# Altium PCB PCB2.PcbDoc
Units mil, origin at the board's own origin, x right, y up, seen from the top; angles counter-clockwise.
Board outline 954.83 x 957.14 mil, 2 copper layers (Top Layer, Bottom Layer); 36 components, 33 nets, 168 pads, 2 vias.
Unrouted connection lines stored in the file: 90.
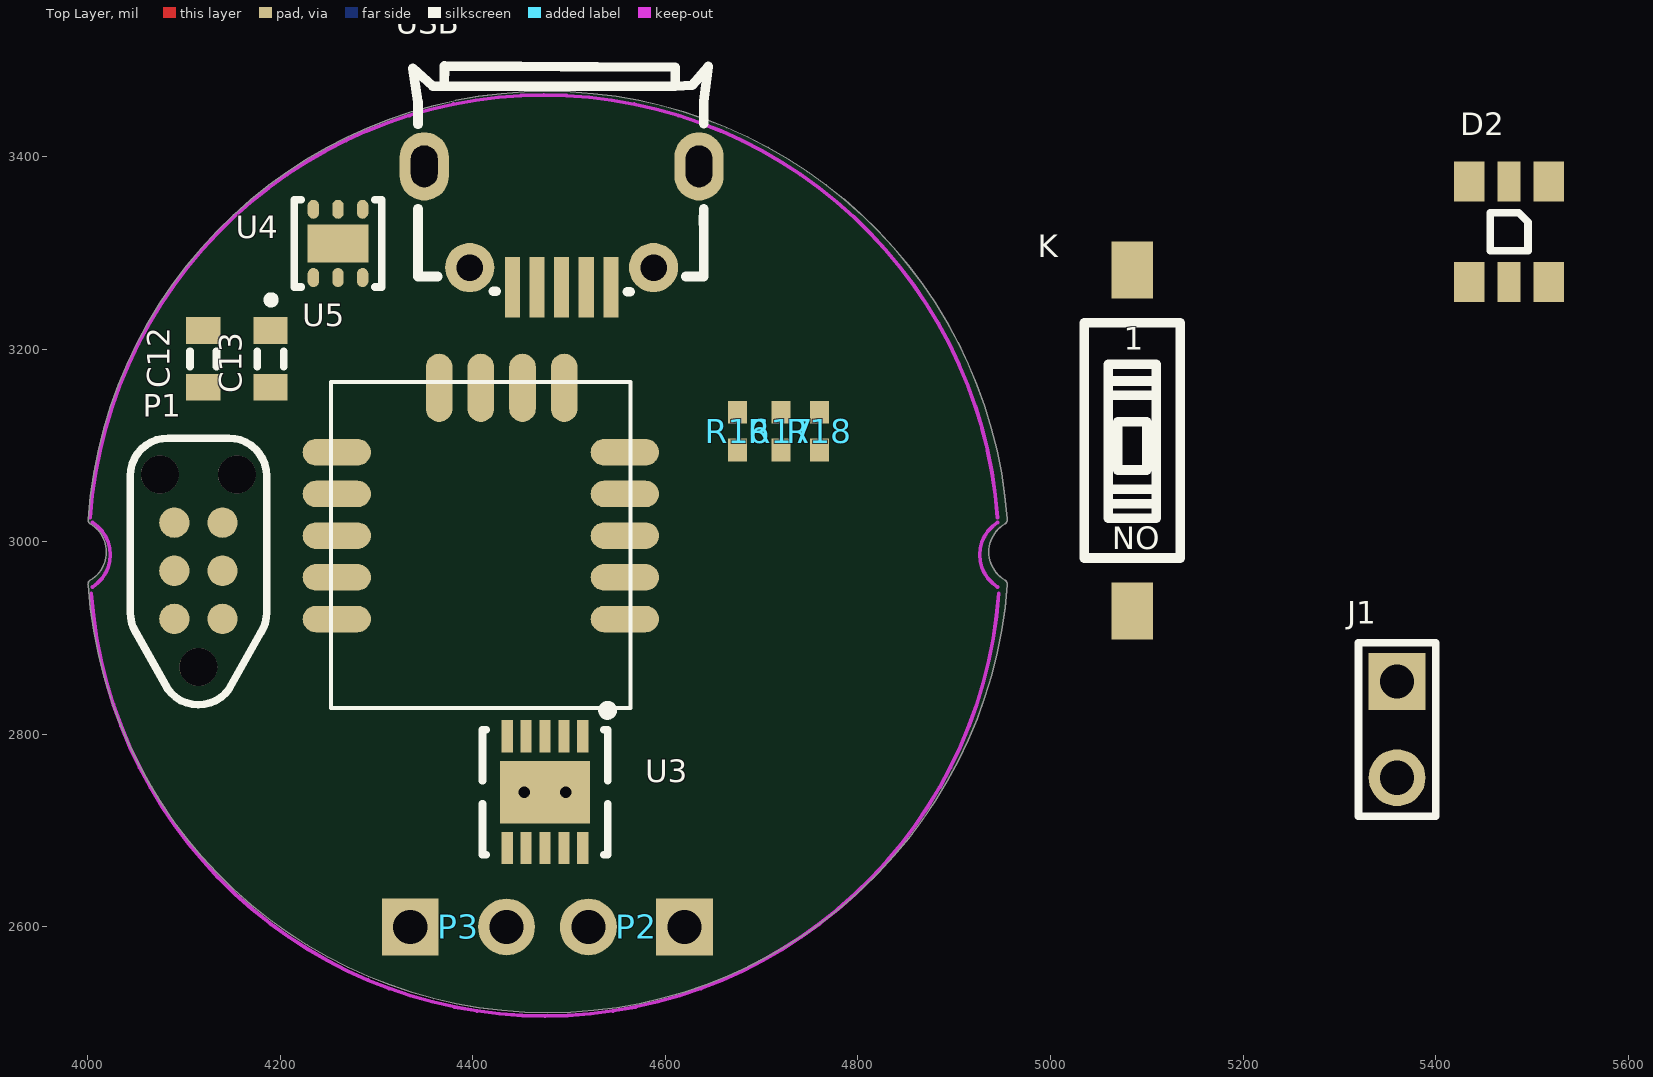
[diagram p0: Top Layer view]
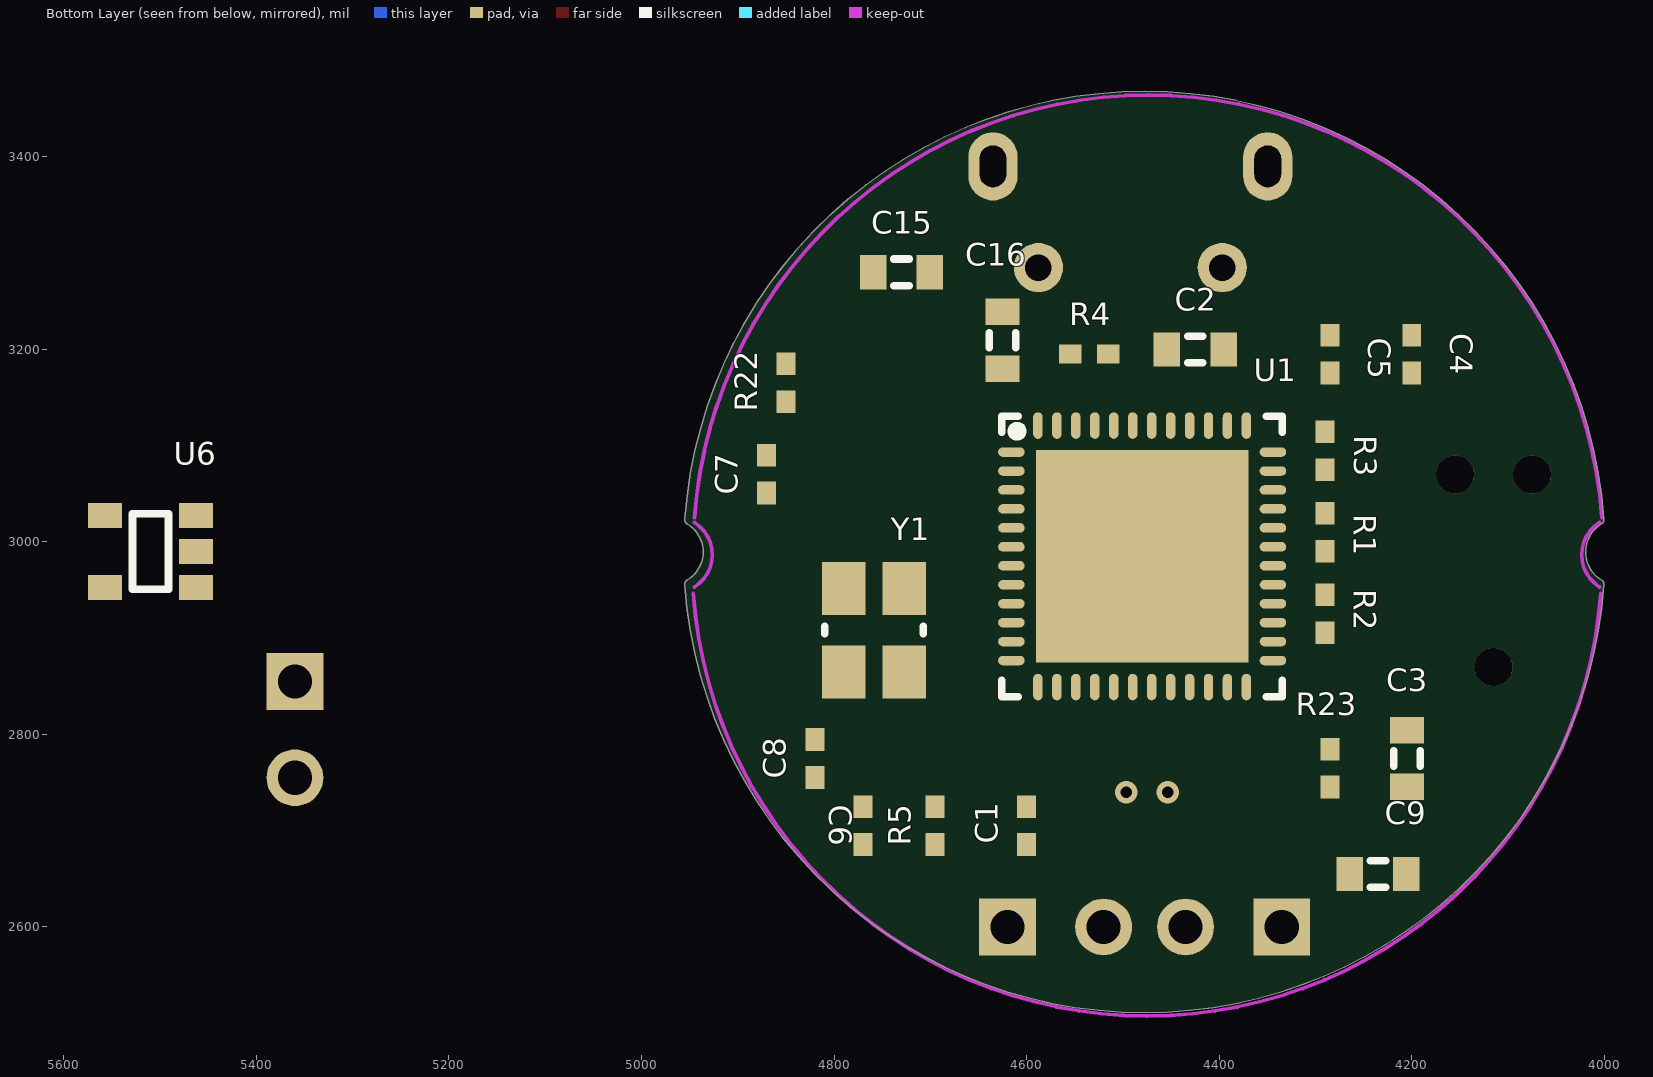
[diagram p1: Bottom Layer view, seen from below]

## Layer stack, top to bottom
Top Solder: solder mask 0.4, Solder Resist, Dk 3.5
Top Layer: signal copper 1.4
Dielectric 1: dielectric 12.6, FR-4, Dk 4.8
Bottom Layer: signal copper 1.4
Bottom Solder: solder mask 0.4, Solder Resist, Dk 3.5

## Board outline
4000.38,2955.11 cw(c4005.32,2955.99) 4002.77,2960.31 ccw(c3985.59,2989.47) 4019.43,2989.47 ccw(c3985.59,2989.47) 4002.8,3018.61 cw(c4005.35,3022.93) 4000.34,3023.28 cw(c4477.72,2989.47) 4955.05,3023.82 4955.13,3022.94 cw(c4950.12,3022.94) 4952.66,3018.62 ccw(c4969.84,2989.47) 4952.64,2960.33 cw(c4950.09,2956.01) 4955.11,2956.01 4955.09,2955.65 cw(c4477.72,2989.47)

## Design rules (kind name [scope] priority, off if disabled: settings)
Clearance [All] p1: gap=5 ignorepadtopadclearanceinfootprint=FALSE
PolygonConnect [All] p1: connectstyle=Relief reliefconductorwidth=10 reliefentries=4 polygonreliefangle="90 Angle" airgapwidth=10
RoutingVias [All] p1: holewidth=28 width=50 viastyle="Through Hole" minholewidth=28 minwidth=50 maxholewidth=28 maxwidth=50
SolderMaskExpansion [All] p1: expansion=4 istentingtop=FALSE
Width [All] p1: maxlimit=10 minlimit=10 preferedwidth=10
30 further rules are at their usual default settings.

## Classes and differential pairs
net class RGBLED[1..3]: RGBLED1 RGBLED2 RGBLED3
net class MOTOR_CONTROL[1..4]: MOTOR_CONTROL1 MOTOR_CONTROL2 MOTOR_CONTROL3 MOTOR_CONTROL4

## Components (designator, comment, footprint, x,y, rotation, side; value= is the part's Value field where it differs from the comment)
C1 "10nF" 0402 4600,2705.31 r90 bottom
C2 "1uF" 0603 4425,3200 r180 bottom
C3 "4.7uF" 0603 4205,2775 r270 bottom
C4 "100nF" 0402 4200,3195 r270 bottom
C5 "100nF" 0402 4285,3195 r270 bottom
C6 "100nF" 0402 4770,2705.32 r270 bottom
C7 "22pF" 0402 4870,3070.31 r90 bottom
C8 "22pF" 0402 4820,2775 r90 bottom
C9 "10uF" 0603 4235,2655 r180 bottom
C12 "1uF" 0603 4120,3190 r90 top
C13 "1uF" 0603 4190,3190 r270 top
C15 "4.7uF" 0603 4730,3280 r0 bottom
C16 "4.7uF" 0603 4625,3209.53 r270 bottom
D2 "SMLVN6RGB1W1" "3.5x2.8 mm 6-SMD" 5476.34,3322.16 r270 top
J1 "78171-0002" HDR1*2 5360,2805 r0 top
K "2.54-1P-PGT" SW-SMD_2P-L6.2-LS9.4 5085,3100 r270 top
P1 "TC2030-IDC-NL" TC2030-IDC-NL 4115,2970 r90 top
P2 "HEADER 2X1 0.05\" UNPOLARIZED" HDR1*2 4570,2600 r270 top
P3 "HEADER 2X1 0.05\" UNPOLARIZED" HDR1*2 4385,2600 r90 top
R1 "22R" 0402 4290,3010 r270 bottom
R2 "22R" 0402 4290,2925.32 r270 bottom
R3 "22R" 0402 4290,3094.68 r90 bottom
R4 "100K" 0402 4535,3195 r180 bottom
R5 "100K" 0402 4695,2705.31 r90 bottom
R16 "22.6R" 0402 4675,3115 r90 top
R17 "130R" 0402 4720,3115 r90 top
R18 "24.9R" 0402 4760,3115 r90 top
R22 "10K" 0402 4850,3165.31 r90 bottom
R23 "100K" 0402 4285,2765 r270 bottom
U1 "STM32F051C8U6" QFN50P700X700X60_HS-49L 4480,2985 r180 bottom
U3 "A3901SEJTR-T" DFN50P300X300X75_HS-11N 4475,2740 r180 top
U4 "ADP122ACPZ-3.3-R7" "LFCSP-6 2.0X2.0X0.55" 4260,3310 r0 top
U5 "DX-BT24-T" DX-BT24-T 4408.31,2996.61 r180 top
U6 "MCP73831T-2ACI/OT" SOT-23-OT5_L 5510,2990 r0 bottom
USB "MicroXNJ" MICRO-USB-SMD_MICROXNJ 4492.29,3327.15 r180 top
Y1 "7V-16.000MAAE-T" "3.2x2.5 CRYSTAL" 4758.5,2908.31 r270 bottom

## Footprints (in the part's own frame and the unit in brackets; to place one, negate y for a bottom-side part, rotate by r counter-clockwise, add the part's x,y. Pads: shape width x height; smd on the part's side, far side on the other; paste and mask are expansions set on the pad)
"3.2x2.5 CRYSTAL" [mm]
  rect 1.4x1.15 smd: 1(-1.1,-0.8) 2(1.1,-0.8) 3(1.1,0.8) 4(-1.1,0.8)
  silkscreen extent -0.1,-1.3 0.1,1.3, body extent -1.6,-1.25 1.6,1.25, height 0.8
"3.5x2.8 mm 6-SMD" [mm] "3.5 x 2.8 mm 6-SMD Flat Leads"
  rect 1.05x0.8 smd: 1(-1.325,1.05) 3(-1.325,-1.05) 4(1.325,-1.05) 6(1.325,1.05)
  rect 1.05x0.6 smd: 2(-1.325,0) 5(1.325,0)
  silkscreen extent -0.5,-0.5 0.5,0.5, body extent -1.75,-1.4 1.75,1.4, height 0.6
0402 [mm] "Chip Body 1.0 x 0.5 mm (LxW typ)"
  rect 0.6x0.5 smd: 1(-0.5,0) 2(0.5,0)
  body extent -0.55,-0.3 0.55,0.3, height 0.55
0603 [mm] "Chip Body 1.6 x 0.8 mm (LxW typ)"
  rect 0.7x0.9 smd: 1(-0.75,0) 2(0.75,0)
  silkscreen extent -0.2,-0.35 0.2,0.35, body extent -0.85,-0.48 0.85,0.48, height 0.9
DFN50P300X300X75_HS-11N [mm]
  rect 0.3x0.85 smd: 1(-1,-1.475) 2(-0.5,-1.475) 3(0,-1.475) 4(0.5,-1.475) 5(1,-1.475) 6(1,1.475) 7(0.5,1.475) 8(0,1.475) 9(-0.5,1.475) 10(-1,1.475)
  rect 2.38x1.65 smd: 11(0,0)
  silkscreen extent -1.78,-2.28 1.65,1.65, body extent -1.5,-1.5 1.5,1.5, height 0.75
DX-BT24-T [mm] "DX-BT24-T"
  oval 1.8x0.7 smd: 1(-3.8,1.95) 2(-3.8,0.85) 2(3.8,-2.45) 3(-3.8,-0.25) 3(3.8,0.85) 4(-3.8,-1.35) 5(-3.8,-2.45) 11(3.8,-1.35) 12(3.8,-0.25) 14(3.8,1.95)
  oval 0.7x1.8 smd: 6(-2.2,-4.15) 7(-1.1,-4.15) 8(0,-4.15) 9(1.1,-4.15)
  silkscreen extent -3.95,-4.3 3.95,4.3
HDR1*2 [mm]
  rect 1.5x1.5 hole 0.9: 1(0,1.27)
  round 1.5 hole 0.9: 2(0,-1.27)
  silkscreen extent -1.02,-2.29 1.02,2.29
"LFCSP-6 2.0X2.0X0.55" [mm] ". 6-Lead Lead Frame Chip Scale Package [LFCSP_UD]  2.00 mm?2.00 mm Body, Ultra Thin, Dual Lead  (CP-6-3)"
  oval 0.3x0.5 smd: 1(-0.65,-0.9) 2(0,-0.9) 3(0.65,-0.9) 4(0.65,0.9) 5(0,0.9) 6(-0.65,0.9)
  rect 1.6x1 smd: 7(0,0)
  silkscreen extent -1.86,-1.59 1.15,1.15, body extent -1,-1 1,1, height 0.6
MICRO-USB-SMD_MICROXNJ [mm]
  rect 0.4x1.6 smd paste-100 mask+0.051: 1(-1.3,1.596) 2(-0.65,1.596) 3(0,1.596) 4(0.65,1.596) 5(1.3,1.596)
  round 1.3 hole 0.7: 6(2.425,1.074) 9(-2.425,1.074)
  oval 1.3x1.8 hole 0.7 slot 1.1 at 90 deg: 7(3.625,-1.596) 8(-3.625,-1.596)
  silkscreen extent -3.87,-4.24 3.93,1.71
QFN50P700X700X60_HS-49L [mm] "QFN, 48-Leads, Body 7,00x7,00mm, Pitch 0,50mm, Thermal Pad 5,60x5,60mm, IPC High Density"
  oval 0.7x0.25 smd: 1(-3.45,2.75) 2(-3.45,2.25) 3(-3.45,1.75) 4(-3.45,1.25) 5(-3.45,0.75) 6(-3.45,0.25) 7(-3.45,-0.25) 8(-3.45,-0.75) 9(-3.45,-1.25) 10(-3.45,-1.75) 11(-3.45,-2.25) 12(-3.45,-2.75) 25(3.45,-2.75) 26(3.45,-2.25) 27(3.45,-1.75) 28(3.45,-1.25) 29(3.45,-0.75) 30(3.45,-0.25) 31(3.45,0.25) 32(3.45,0.75) 33(3.45,1.25) 34(3.45,1.75) 35(3.45,2.25) 36(3.45,2.75)
  oval 0.25x0.7 smd: 13(-2.75,-3.45) 14(-2.25,-3.45) 15(-1.75,-3.45) 16(-1.25,-3.45) 17(-0.75,-3.45) 18(-0.25,-3.45) 19(0.25,-3.45) 20(0.75,-3.45) 21(1.25,-3.45) 22(1.75,-3.45) 23(2.25,-3.45) 24(2.75,-3.45) 37(2.75,3.45) 38(2.25,3.45) 39(1.75,3.45) 40(1.25,3.45) 41(0.75,3.45) 42(0.25,3.45) 43(-0.25,3.45) 44(-0.75,3.45) 45(-1.25,3.45) 46(-1.75,3.45) 47(-2.25,3.45) 48(-2.75,3.45)
  rect 5.6x5.6 smd: 49(0,0)
  silkscreen extent -3.7,-3.7 3.7,3.7, body extent -3.55,-3.55 3.55,3.55, height 0.6
SOT-23-OT5_L [mm] "SOT23, 5-Leads, Body 2.9x1.6mm, Pitch 0.95mm, Lead Span 2.7mm, IPC High Density"
  rect 0.9x0.65 smd: 1(-1.2,0.95) 2(-1.2,0) 3(-1.2,-0.95) 4(1.2,-0.95) 5(1.2,0.95)
  silkscreen extent -0.47,-1 0.47,1, body extent -0.9,-1.55 0.9,1.55, height 1.45
SW-SMD_2P-L6.2-LS9.4 [mm]
  rect 1.5x1.1 smd paste+0 mask+0.051: 1(-4.636,-0.002) 2(4.364,-0.002)
  silkscreen extent -3.24,-1.27 2.96,1.27
TC2030-IDC-NL [mm] "TagConnector TC2030-IDC-NL"
  round 0.8 smd paste-1: 1(-1.27,-0.635) 2(-1.27,0.635) 3(0,-0.635) 4(0,0.635) 5(1.27,-0.635) 6(1.27,0.635)
  round 1 hole 1 unplated mask+0: ""(-2.54,0) ""(2.54,-1.016) ""(2.54,1.016)
  Top Layer pour cut-out: -1.27,-0.085 -1.27,0.085 -1.06,0.127 -0.881,0.246 -0.762,0.425 -0.72,0.635 -0.72,0.635 -0.55,0.635 -0.496,0.396 -0.343,0.205 -0.122,0.099 0.122,0.099 0.343,0.205 0.496,0.396 0.55,0.635 0.55,0.635 0.72,0.635 0.762,0.425 0.881,0.246 1.06,0.127 1.27,0.085 1.27,0.085 1.27,-0.085 1.06,-0.127 0.881,-0.246 0.762,-0.425 0.72,-0.635 0.72,-0.635 0.55,-0.635 0.496,-0.396 0.343,-0.205 0.122,-0.099 -0.122,-0.099 -0.343,-0.205 -0.496,-0.396 -0.55,-0.635 -0.55,-0.635 -0.72,-0.635 -0.762,-0.425 -0.881,-0.246 -1.06,-0.127 -1.27,-0.085
  silkscreen extent -3.54,-1.8 3.5,1.8, body extent -1.67,-1.03 1.67,1.03, height 0

## Part data
C1: "10nF 0402 X7R 25V ±5%", Supplier Part Number 1=1692285, Supplier 1=Farnell, Supplier 2=Digi-Key, Supplier Part Number 2=399-1279-1-ND
C2 C12 C13: "1uF 0603 X5R 10V ±10%", Supplier Part Number 1=1759399, Supplier 1=Farnell, Supplier 2=Digi-Key, Supplier Part Number 2=478-1251-1-ND
C3 C15 C16: "4.7uF 0603 X5R 10V ±10%", Supplier Part Number 1=2362098, Supplier 1=Farnell, Supplier 2=Digi-Key, Supplier Part Number 2=445-5170-1-ND
C4 C5 C6: "100nF 0402 X7R 16V ±10%", Supplier Part Number 1=1288252, Supplier 1=Farnell, Supplier 2=Digi-Key, Supplier Part Number 2=399-3521-1-ND
C7 C8: "22pF 0402 NP0/CG0 50V ±5%", Supplier Part Number 1=1414580, Supplier 1=Farnell, Supplier 2=Digi-Key, Supplier Part Number 2=490-5868-1-ND
C9: "10uF 0603 X5R 6.3V ±20%", Supplier Part Number 1=2456110, Supplier 1=Farnell, Supplier 2=Digi-Key, Supplier Part Number 2=490-10475-1-ND
D2: "ROHM SMLVN6RGB1W1 LED Tri-Color Blue/Green/Red Chip LED 6-Pin 1411 T/RLED Tri-Color Blue/Green/Red Chip LED 6-Pin 1411", Supplier Part Number 1=755-SMLVN6RGB1W1, Supplier 1=Mouser, Supplier 2=Digi-Key, Supplier Part Number 2=846-1187-1-ND
J1: "Molex Pico-EZmate™ Wire-to-Board Header, 2 contacts", Supplier Part Number 1=2313710, Supplier 1=Farnell, Supplier 2=Digi-Key, Supplier Part Number 2=WM4459CT-ND
P1: "TagConnect TC2030-IDC-NL SWD Programming Connector"
R1 R2 R3: "22R 0402 1/16W ±1%", Supplier Part Number 1=2072797, Supplier 1=Farnell, Supplier 2=Digi-Key, Supplier Part Number 2=541-22.0LCT-ND
R4 R5 R23: "100K 0402 1/16W ±1%", Supplier Part Number 1=2072519, Supplier 1=Farnell, Supplier 2=Digi-Key, Supplier Part Number 2=541-100KLCT-ND
R16: "22.6R 0402 1/16W ±0.05R", Supplier Part Number 1=2302454, Supplier 1=Farnell, Supplier 2=Digi-Key, Supplier Part Number 2=P22.6LCT-ND
R17: "130R 0402 1/16W ±0.05R", Supplier Part Number 1=2059115, Supplier 1=Farnell, Supplier 2=Digi-Key, Supplier Part Number 2=P130LCT-ND
R18: "24.9R 0402 1/16W ±0.05R", Supplier Part Number 1=2059102, Supplier 1=Farnell, Supplier 2=Digi-Key, Supplier Part Number 2=P24.9LCT-ND
R22: "10K 0402 1/16W ±1%", Supplier Part Number 1=2072517, Supplier 1=Farnell, Supplier 2=Digi-Key, Supplier Part Number 2=541-10.0KLCT-ND
U1: "STMICROELECTRONICS  STM32F051C8U6  MCU 32BIT CORTEX-M0 48MHZ UFQFPN-48", Supplier Part Number 1=2393638, Supplier 1=Farnell, Supplier 2=Digi-Key, Supplier Part Number 2=STM32F051C8U6-ND
U3: "ALLEGRO MICROSYSTEMS - A3901SEJTR-T - IC, MOTOR DRIVER", Supplier Part Number 1=1651947, Supplier 1=Farnell, Supplier 2=Digi-Key, Supplier Part Number 2=620-1159-1-ND
U4: "Analog Devices ADP122ACPZ-3.3-R7 - 5.5 V Input, 300 mA, Low Quiescent  Current, CMOS Linear Regulator", Supplier Part Number 1=2457164, Supplier 1=Farnell, Supplier 2=Digi-Key, Supplier Part Number 2=ADP122ACPZ-3.3-R7CT-ND
U6: "Miniature Single-Cell, Fully Integrated Li-Ion, Li-Polymer Charge Management Controller, 4.2V, 5-Pin SOT-23, Industrial Temperature, Tape and Reel", Supplier Part Number 1=1332158, Code_IPC=SOT23-5, ComponentLink1Description=Datasheet, ComponentLink1URL=http://ww1.microchip.com/downloads/en/DeviceDoc/21984e.pdf, ComponentLink2Description="Packaging Specification", ComponentLink2URL=http://www.microchip.com/stellent/groups/techpub_sg/documents/packagingspec/en012702.pdf, ComponentLink3Description="Microchip.com Home", ComponentLink3URL=http://www.microchip.com/, DatasheetVersion="revE, Sep-2008", LatestRevisionDate=27-Nov-2009, LatestRevisionNote="Updated to datasheet revision E, Sep-2008", PackageDescription="5-Lead Plastic Small Outline Transistor (OT) [SOT-23]", PackageReference=SOT-23-OT5, PackageVersion="revBB, Aug-2009", Published=29-Jan-2009, Publisher="Altium Limited", Supplier 1=Farnell
USB: Core Colour=黑色, Current Rating - Power (Max)=1.8A, JLCPCB Part Class="Extended Part", LCSC Part Name="Micro-B 母 卧贴", Manufacturer="SHOU HAN(首韩)", Operating Temperature Range=-20℃~+85℃, Rated Voltage (Max)=30V, Add into BOM=yes, Connect-Disconnect Life=5千次, Connector Type=Micro-B, Convert to PCB=yes, Datasheet=https://atta.szlcsc.com/upload/public/pdf/source/20220415/2494EDFF499AF6F852F7C820374B6AF3.pdf, Device=MicroXNJ, Gender=母, Manufacturer Part=MicroXNJ, Mounting Style=卧贴, Number of Contacts=5P, Number of Ports=1, Standard="USB 2.0", Supplier=LCSC, Supplier Footprint=SMD, Supplier Part=C404969, Symbol=MICROXNJ
Y1: "TXC - 7V-16.000MAAE-T, 16MHZ, 30PPM, 12PF - CRYSTAL", Supplier Part Number 1=887-1462-1-ND, Supplier 1=Digi-Key, Supplier 2=Farnell, Supplier Part Number 2=1892172
U5: PCB DECAL=DX-BT24-S

## Via types
v1: diameter 23.62, hole 11.81, Top Layer to Bottom Layer, 2 vias

## Nets (pads, with @x,y where several pads share a name; then routed paths per layer and width w, separated by ;. In a path a pad name is that pad's centre, name@x,y a point inside that pad or via, vN(x,y) a via of type N, cw(c..) or ccw(c..) an arc to the next point about the centre after c; other vN are vias at no path point)
+3.3V: C1.2 C2.2 C3.2 C4.2 C5.2 C9.2 C13.2 D2.1 D2.2 D2.3 P1.1 R5.2 R23.2 U1.9 U1.24 U1.48 U3.8 U4.1 U5.8
+5: C15.2 U6.4 USB.1
BT_RX: U1.43 U5.2@4557.91,2963.15
BT_TX: U1.42 U5.11
CHARGING: R23.1 U1.26 U6.1
GND: C1.1 C2.1 C3.1 C4.1 C5.1 C6.1 C7.1 C8.1 C9.1 C12.1 C13.1 C15.1 C16.1 J1.2 P1.5 R4.1 R22.2 U1.8 U1.23 U1.47 U1.49 U3.3 U3.11 U4.2 U4.3 U4.5 U4.7 U5.14 U6.2 USB.5 Y1.2 Y1.4
  other v1: 4453.35,2740 4496.65,2740
IMU_INT: U1.25
MCU_X1_16MHZ: C7.2 U1.5 Y1.1
MCU_X2_16MHZ: C8.2 U1.6 Y1.3
MOTOR_CONTROL1: U1.10 U3.1
MOTOR_CONTROL2: U1.11 U3.2
MOTOR_CONTROL3: U1.12 U3.4
MOTOR_CONTROL4: U1.13 U3.5
NetC12_2: C12.2 K.2 U4.4 U4.6
NetD2_4: D2.4 R16.2
NetD2_5: D2.5 R17.2
NetD2_6: D2.6 R18.2
NetP1_2: P1.2 R1.2
NetP1_3: P1.3 R2.2
NetP1_4: P1.4 R3.2
NetP2_1: P2.1 U3.10
NetP2_2: P2.2 U3.9
NetP3_1: P3.1 U3.6
NetP3_2: P3.2 U3.7
NetR4_2: R4.2 U1.44
NetR22_1: R22.1 U6.5
NRST: C6.2 R2.1 R5.1 U1.7
RGBLED1: R17.1 U1.31
RGBLED2: R16.1 U1.32
RGBLED3: R18.1 U1.30
SWCLK: R3.1 U1.37
SWDIO: R1.1 U1.34
VBAT: C16.2 J1.1 K.1 U1.1 U6.3
pads on no net: P1. P1.6 U1.2 U1.3 U1.4 U1.14 U1.15 U1.16 U1.17 U1.18 U1.19 U1.20 U1.21 U1.22 U1.27 U1.28 U1.29 U1.33 U1.35 U1.36 U1.38 U1.39 U1.40 U1.41 U1.45 U1.46 U5.1 U5.2@4258.7,3093.07 U5.3 U5.4 U5.5 U5.6 U5.7 U5.9 U5.12 USB.2 USB.3 USB.4 USB.6 USB.7 USB.8 USB.9

## Keep-outs
Keep-Out Layer:
  lines w3.94: 4002.48,3025 cw(c4473.74,2991.63) 4945,3025 ; 4003.74,2946.63 ccw(c4475,2980) 4946.26,2946.63 ; 4005,2953.23 ccw(c3984.13,2986.62) 4005,3020 ; 4945,2953.23 cw(c4965.87,2986.62) 4945,3020

## Silkscreen, mask and mechanical layers (free items; w line width, h text height)
Mechanical 2:
  lines w10: 4005.32,2955.99 ccw(c3985.59,2989.47) 4005.35,3022.93 cw(c4477.72,2989.47) 4950.09,3023 ; 4005.35,2955.94 ccw(c4477.72,2989.47) 4950.09,2956.01 cw(c4969.84,2989.47) 4950.12,3022.94
Mechanical 10:
  lines w3.94: 4005,3025 cw(c4476.26,2991.63) 4947.52,3025 ; 4003.82,2955.9 ccw(c4475.08,2989.27) 4946.34,2955.9 ; 4003.82,2955.89 ccw(c3982.95,2989.27) 4003.82,3022.65 ; 4003.82,2955.89 ccw(c3982.95,2989.27) 4003.82,3022.65 ; 4003.82,2955.9 ccw(c4475.08,2989.27) 4946.34,2955.9 ; 4003.82,3022.64 cw(c4475.08,2989.27) 4946.34,3022.64 ; 4003.82,3022.64 cw(c4475.08,2989.27) 4946.34,3022.64 ; 4008.82,2955.89 ccw(c3987.95,2989.27) 4008.82,3022.65 ; 4008.82,2955.9 ccw(c4480.08,2989.27) 4951.34,2955.9 ; 4008.82,2955.9 ccw(c4480.08,2989.27) 4951.34,2955.9 ; 4008.82,2955.89 ccw(c3987.95,2989.27) 4008.82,3022.65 ; 4008.82,3022.64 cw(c4480.08,2989.27) 4951.34,3022.64 ; 4008.82,3022.64 cw(c4480.08,2989.27) 4951.34,3022.64 ; 4946.34,2955.89 cw(c4967.21,2989.27) 4946.34,3022.65 ; 4946.34,2955.89 cw(c4967.21,2989.27) 4946.34,3022.65 ; 4951.34,2955.89 cw(c4972.21,2989.27) 4951.34,3022.65 ; 4951.34,2955.89 cw(c4972.21,2989.27) 4951.34,3022.65

## Text inside footprints (layer, text, board x,y; h text height)
K: Top Overlay "1" at 5076.31,3191.94 h40; Top Overlay "ON" at 5113.65,3023.28 h40 r180